# Altium PCB VA_HUB_PCB.PcbDoc (part 7 of 12)
Units mil, origin at the board's own origin, x right, y up, seen from the top; angles counter-clockwise.
Board outline 4408 x 3619 mil, 8 copper layers (Top Layer, Routing 1, Routing 2, Power Plane, GND Plane, Routing 3, Routing 4, Bottom Layer), stack 85.156 mil thick; 569 components, 440 nets, 2911 pads, 1518 vias.
Unrouted connection lines stored in the file: 46.
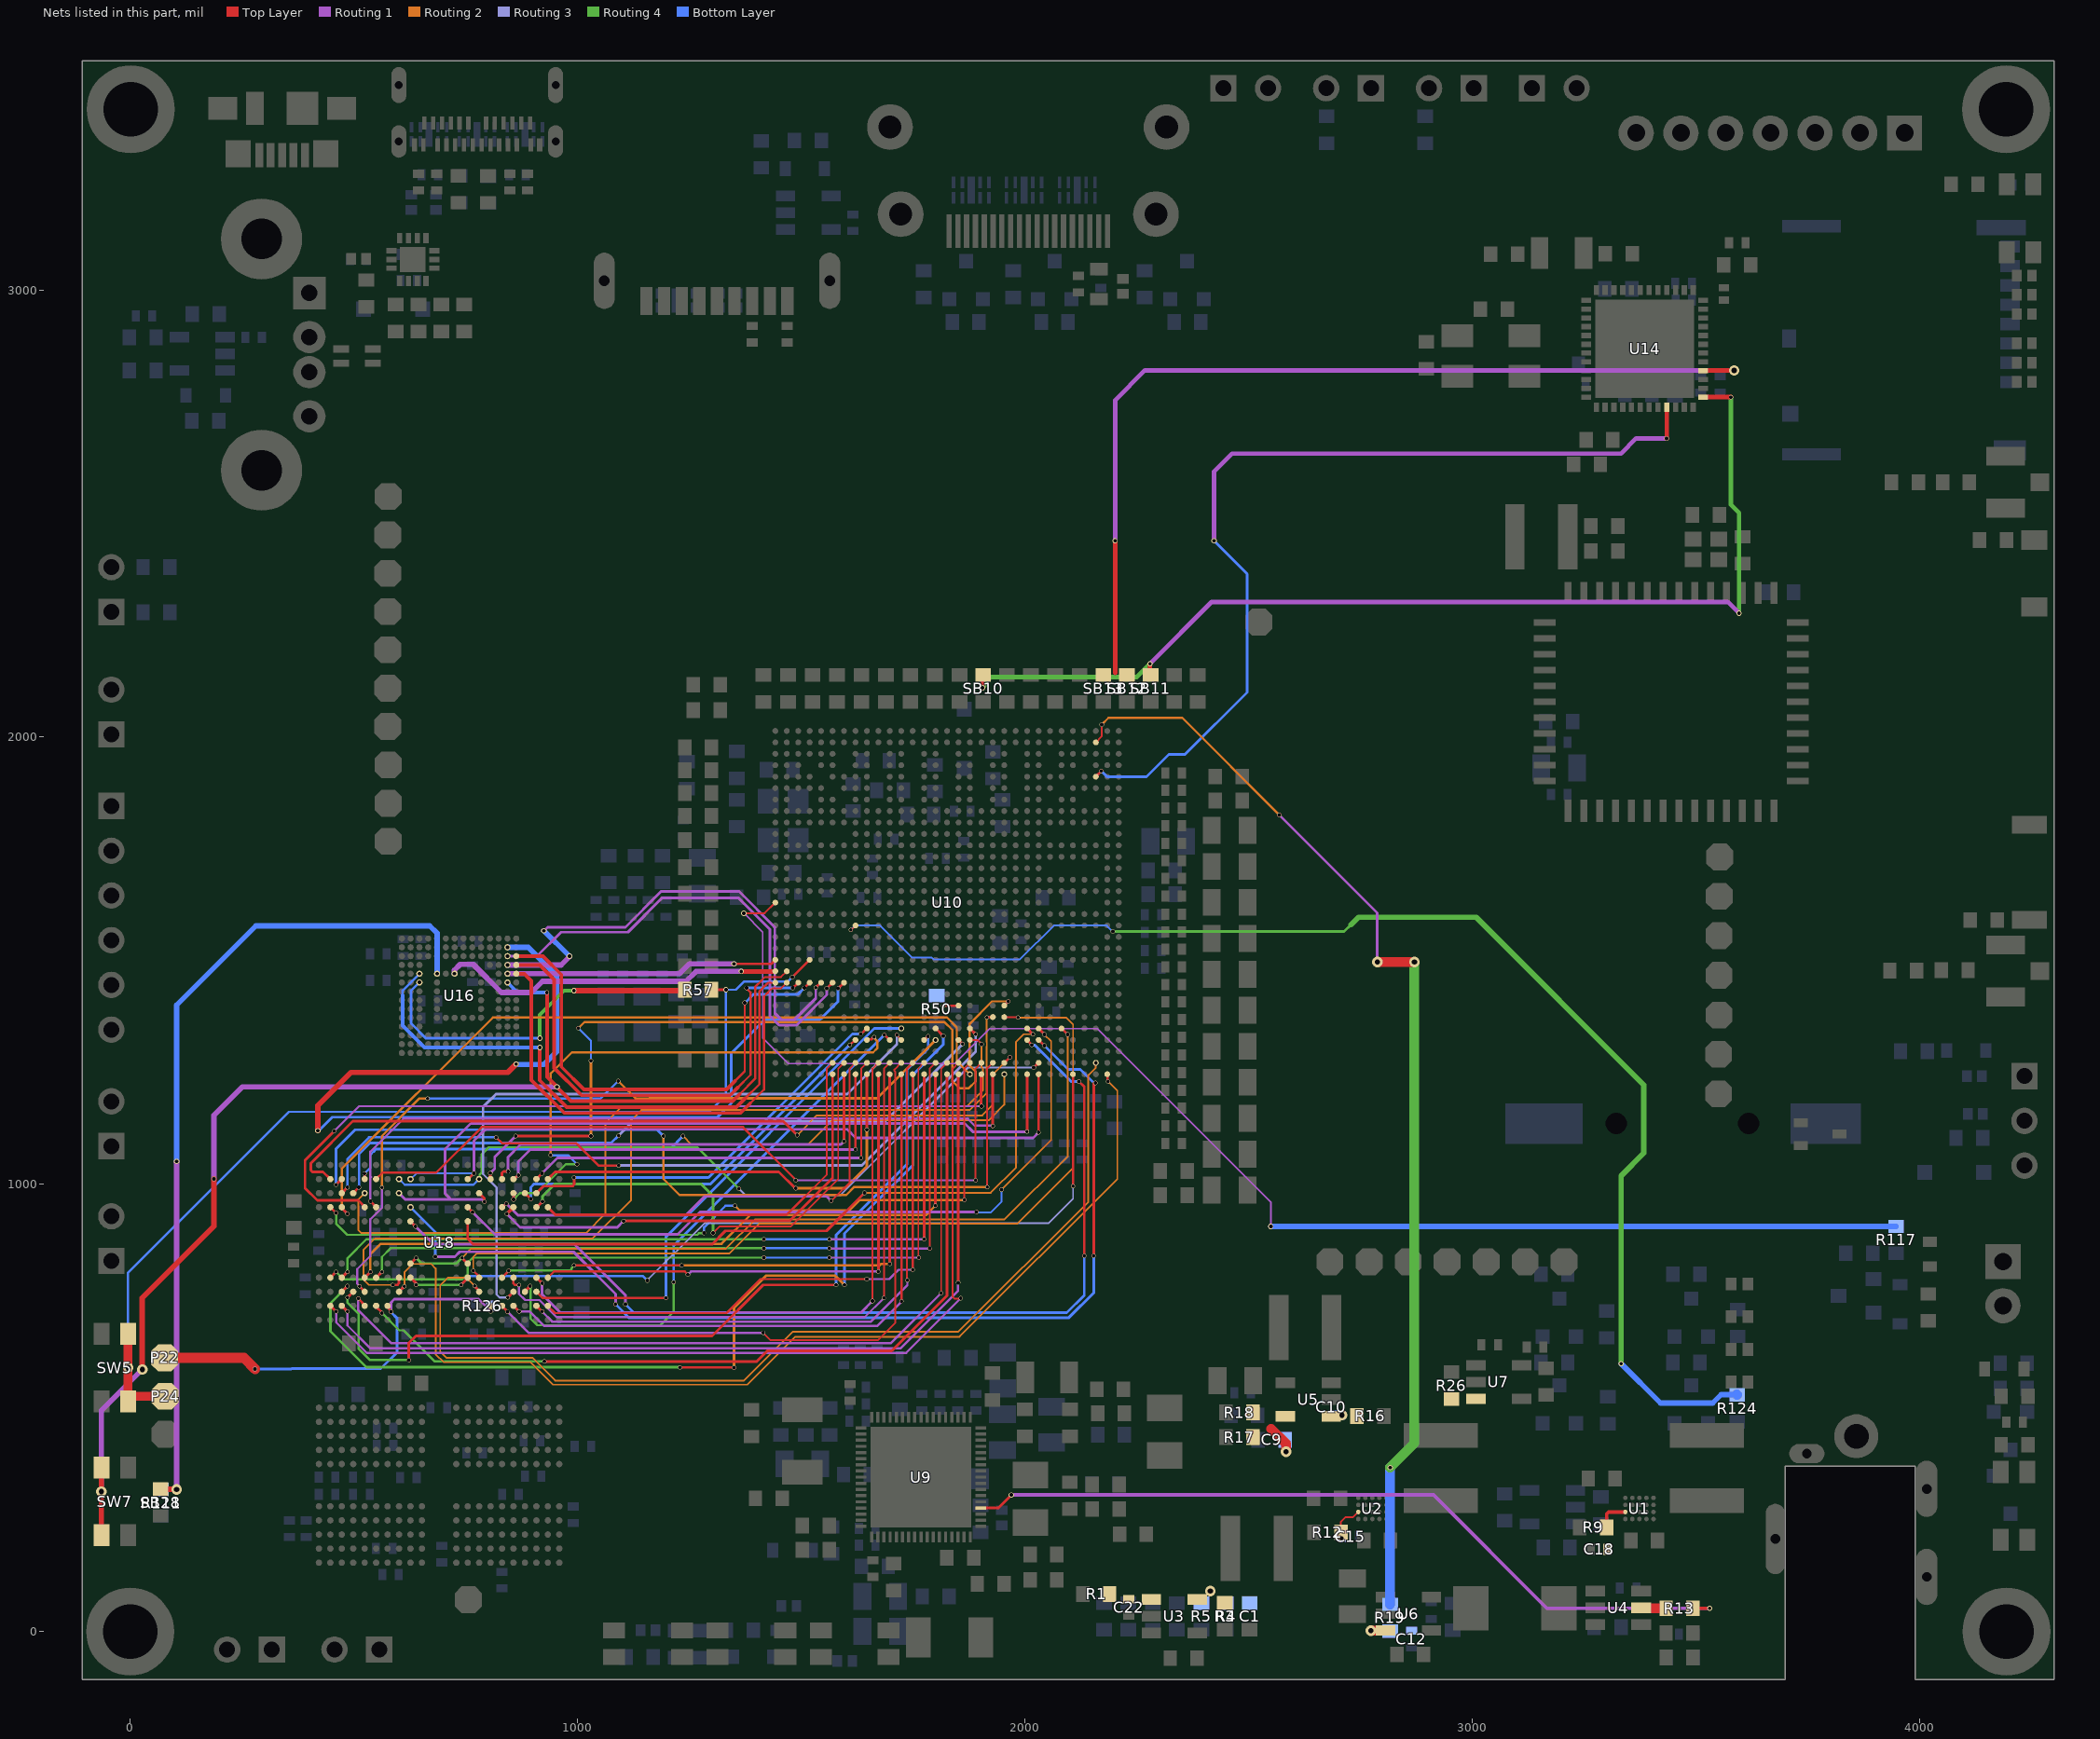
[diagram p10: the nets of this part, all layers, seen from the top]

## Via types
v1: diameter 9.84, hole 7.87, Top Layer to Bottom Layer, 821 vias
v2: diameter 11.81, hole 7.87, Top Layer to Bottom Layer, 575 vias
v3: diameter 23.62, hole 11.81, Top Layer to Bottom Layer, 122 vias

## Nets (pads, with @x,y where several pads share a name; then routed paths per layer and width w, separated by ;. In a path a pad name is that pad's centre, name@x,y a point inside that pad or via, vN(x,y) a via of type N, cw(c..) or ccw(c..) an arc to the next point about the centre after c; other vN are vias at no path point) (continued)
DDR1.DDR1_A3: U10.A9 U18.H10 U18.R10 | length 1801.7
  Top Layer w6: U18.R10@780.18,980.24 791.86,968.55 791.86,961.14 v1(792,961) ; v1@2005.32,1118 U10.A9@2005.32,1246.06
  Routing 1 w6: v1(601.05,980.24) 614.84,966.44 716,966.44 ; v1(792,961) 786.56,966.44 716,966.44 ; 1884,1117 v1@2006,1117 ; 1884,1118 1866,1136 761,1136 704,1079 704,979.16 716,967.16 716,966.44
  other v1: 2005,1118
DDR1.DDR1_A4: U10.B8 U18.H11 U18.R11 | length 1665.8
  Top Layer w4: v1(2020,1261) v1@2020.13,1261 ; U10.B8@2030.78,1271.65 U10.B8@2030.91,1271.65
  Top Layer w5: v1(601.05,1011.73) U18.H11@601.05,1011.84
  Top Layer w6: v1@2020.13,1261 U10.B8@2030.78,1271.65
  Routing 4 w5: v1(780.18,1011.73) 781.11,1012.66 781.11,1021.76 786,1026.65 786,1067 802,1083 1268,1083 v1(1361,990)
  Routing 3 w5: v1(1361,990) 1375,976 1588,976 1873,1261 v1(2020,1261)
  Bottom Layer w5: v1(601.05,1011.73) 613.84,998.94 767.39,998.94 v1(780.18,1011.73)
DDR1.DDR1_A5: U10.A8 U18.J11 U18.P11 | length 1653.8
  Top Layer w6: U18.P11@754.59,1013.02 757.05,1013.02 v1@767.74,1023.71 ; U10.A8@2030.91,1246.06 U10.A8@2030.91,1246.06 2030.95,1116.05 v1(2031,1116)
  Routing 1 w6: v1(768.74,1024.53) 768.74,1097.74 793.92,1122.92 1603.08,1122.92 1622,1104 2019,1104 v1(2031,1116)
  Bottom Layer w4: v1(626.64,1011.73) 639.43,1024.53 v1(768.74,1024.53)
DDR1_CKE0: U10.A5 U18.J4 U18.P4 | length 1874
  Top Layer w5: U10.A5@2107.68,1246.06 2107.84,1245.9 2107.84,996.16 v1(2108,996)
  Top Layer w6: U18.J4@626.64,791.26 v1@638.82,779.07 ; v1(740,775) 740,775.83 754.59,790.43 U18.P4@754.59,791.26
  Routing 4 w6: v1(639.56,775.16) 639.64,775.08 739.92,775.08 v1(740,775)
  Routing 3 w4: v1(1156,785) 1284,913 2053,913 2108,968 v1(2108,996)
  Bottom Layer w5: v1(740,775) 759.5,794.5 1146.5,794.5 v1(1156,785)
DDR1_CKE1: U10.E6 U18.J5 U18.P5 | length 1888.3
  Top Layer w5: U10.E6@2082.44,1348.32 2095.76,1335 v1(2096,1335)
  Top Layer w6: U18.J5@626.64,822.76 626.78,822.76 639.43,835.41 v1(639.57,835.41) ; v1(741.79,835.55) U18.P5@754.59,822.76
  Routing 4 w6: v1(639.57,835.41) 651.99,823 729.24,823 v1(741.79,835.55)
  Routing 2 w4: v1(741.79,835.55) 762.24,856 1332,856 1397,921 1954,921 2096,1063 v1(2096,1335)
DDR1_CLK0N: U10.D8 U18.J9 | length 2340.1
  Top Layer w6: U10.D8@2030.91,1322.83 v1(2043.7,1310.03) ; v1(2154,840) v1@2154,1226.82
  Routing 1 w6: v1(682,838) 725.97,838 736.97,849 991,849 1085,755 v1(1085,731.58)
  Bottom Layer w6: v1(626.64,948.74) 682,893.38 v1(682,838) ; v1(1085,731.58) 1114.66,701.92 2098.48,701.92 2154,757.44 v1(2154,840) ; v1(2043.7,1310.03) 2096.74,1257 2123.82,1257 v1@2154,1226.82
  other v1: 2158,1226.82
DDR1_CLK0P: U10.D9 U18.J8 | length 2255
  Top Layer w6: U18.J8@626.64,917.24 626.7,917.24 637.94,906 v1(638,906) ; U10.D9@2005.32,1322.83 2005.32,1322.33 v1@2014.82,1312.82 ; v1(2121,1230) 2132.82,1218.18 v1(2132.82,840)
  Routing 1 w6: v1(638,906) 678,866 993,866 1107,752 v1(1107,731.58)
  Bottom Layer w6: v1(1107,731.58) 1125.66,712.92 2093.92,712.92 2132.82,751.82 v1(2132.82,840) ; v1(2015.82,1311.82) 2016.56,1311.09 2022.56,1311.09 2103.64,1230 v1(2121,1230)
DDR1_CLK1N: U10.E8 U18.P9 | length 1694.1
  Top Layer w6: U18.P9@754.59,948.74 v1(765.57,937.76) ; U10.E8@2030.91,1348.42 v1@2043.7,1335.62
  Routing 1 w6: v1(765.57,937.76) 815.33,888 1224,888 1274,938 v1(1892,938)
  Routing 2 w4: v1(1948,988) 2059,1099 2059,1319.7 v1(2043.7,1335)
  Bottom Layer w4: v1(1892,938) 1893.12,936.88 1923.88,936.88 1948,961 v1(1948,988)
DDR1_CLK1P: U10.E9 U18.P8 | length 1686.1
  Top Layer w5: U10.E9@2005.66,1346.65 2005.66,1348.07 U10.E9@2005.66,1348.42
  Top Layer w6: U18.P8@754.59,917.24 754.59,878.41 766.5,866.5 1301.5,866.5 1330.82,895.82 1556.82,895.82 v1(1641.82,980.82) ; U10.E9@2005.32,1348.42 2005.66,1348.07 v1(2018.11,1335.62)
  Routing 2 w4: v1(1641.82,980.82) 1923.82,980.82 1980.62,1037.62 1980.62,1318.62 1997.62,1335.62 v1(2018.11,1335.62)
DDR1_CS0N: U10.F12 U18.H4 | length 1990.5
  Top Layer w6: v1(587,775) 597.53,775 601.05,778.51 U18.H4@601.05,791.26 ; v1(1915,1373) 1915.51,1373.51 1928.04,1373.51 U10.F12@1928.55,1374.01
  Routing 2 w4: v1(587,775) 534,775 522,787 522,854 547,879 1034,879 1120,965 1120,1143 1143,1166 1877,1166 1915,1204 1915,1307.93 1915.13,1308.06 1915.13,1317.94 1915,1318.07 v1(1915,1373)
DDR1_CS1N: U10.A2 U18.H3 | length 2308
  Top Layer w5: U10.A2@2184.45,1245.71 2185.23,1244.94 2185.23,1230.77 v1(2186,1230)
  Top Layer w6: U18.H3@601.05,759.76 601.05,759.91 613,771.86 v1(613,772)
  Routing 2 w4: v1(613,772) 613,803 632,822 673,822 683,812 683,620 701,602 895,602 945,552 1380,552 1487,659 1854,659 2207,1012 2207,1209 v1(2186,1230)
DDR1_CS2N: U10.F11 U18.R4 | length 1956.5
  Top Layer w5: v1(767.07,806.92) 776.14,797.85 776.14,797.78 780.18,793.74 U18.R4@780.18,791.26 ; U10.F11@1954.14,1374.01 1954.64,1373.51 1984.49,1373.51 v1(1985,1373)
  Routing 2 w4: v1(767.07,806.92) 767.07,838.07 774,845 1339,845 1406,912 1983,912 2108,1037 2108,1357 2092,1373 v1(1985,1373)
DDR1_CS3N: U10.B3 U18.R3 | length 2216.1
  Top Layer w5: U10.B3@2158.86,1271.3 v1(2158.86,1271.65)
  Top Layer w6: v1(770,773) 770,771.96 780.18,761.78 U18.R3@780.18,760.2
  Routing 2 w4: v1(770,773) 752,791 710,791 693,774 693,626 707,612 899,612 950,561 1372,561 1481,670 1851,670 2142,961 2142,1244 2158.86,1260.86 v1(2158.86,1271.65)
DDR1_D0: U10.B15 U18.B2 | length 2066.7
  Top Layer w4: U10.B15@1851.77,1271.65 1838.73,1258.6 1838.73,748 1842.42,744.31 v1@1857,744.31
  Top Layer w6: U18.B2@447.5,728.27 U18.B2@447.5,728.27 460.36,715.47 v1(460.43,715.47)
  Routing 1 w5: v1(460.43,715.47) 460.3,715.35 460.3,691.7 529,623 1734.69,623 v1(1857,745.31)
DDR1_D1: U10.A15 U18.C2 | length 1973.7
  Top Layer w6: U18.C2@473.09,728.27 v1(485.89,715.47) ; v1(1851,780) 1851.39,780.39 1851.39,1245.67 U10.A15@1851.77,1246.06
  Routing 1 w5: v1@485.76,715.35 485.76,684.24 537,633 1722,633 1851,762 v1(1851,780)
  Routing 1 w6: v1@485.76,715.35 v1(485.89,715.47)
DDR1_D2: U10.B16 U18.E2 | length 1948.5
  Top Layer w4: v1(1813,757) 1813.09,757.09 1813.09,1258.55 U10.B16@1826.18,1271.65
  Top Layer w6: v1(510,745) U18.E2@524.28,728.27
  Routing 1 w5: v1(510,745) 510,718.36 583.36,645 1701,645 v1(1813,757)
DDR1_D3: U10.A16 U18.F2 | length 1885.5
  Top Layer w6: U18.F2@549.87,728.27 549.87,726.17 563,713.04 v1(563,712) ; v1(926,604) 1401,604 1425,628 1703,628 1826.18,751.18 U10.A16@1826.18,1246.06
  Routing 4 w5: v1(563,712) 601.46,673.54 611.46,673.54 681,604 v1(926,604)
DDR1_D4: U10.B17 U18.F4 | length 1705.3
  Top Layer w4: v1(1787.55,856.55) 1787.55,1258.6 U10.B17@1800.59,1271.65
  Top Layer w6: U18.F4@549.87,791.26 v1(562.66,804.06)
  Routing 1 w5: v1(1563,857) 1563.45,856.55 v1(1787.55,856.55)
  Routing 4 w5: v1(562.66,804.06) 562.66,837.66 582,857 v1(1416.82,857)
  Bottom Layer w5: v1(1416.82,857) v1(1563,857)
DDR1_D5: U10.A17 U18.E4 | length 1660.1
  Top Layer w6: U18.E4@524.28,791.26 v1(537.07,804.06) ; v1(1800,952) 1800,1245.46 U10.A17@1800.59,1246.06
  Routing 2 w5: v1(537.07,804.06) 537.07,844.07 560,867 1322,867 1386,931 1779,931 v1(1800,952)
DDR1_D6: U10.A18 U18.C4 | length 1724.5
  Top Layer w6: U18.C4@473.09,791.26 v1(485.89,804.06) ; v1(1775,877) U10.A18@1775,1246.06
  Routing 1 w5: v1(1563,877) v1(1775,877)
  Routing 4 w5: v1(485.89,804.06) 485.89,834.75 528.14,877 v1(1416.82,877)
  Bottom Layer w5: v1(1416.82,877) v1(1563,877)
DDR1_D7: U10.B18 U18.B4 | length 1803.4
  Top Layer w4: v1@1761.96,836 1761.96,1258.6 U10.B18@1775,1271.65
  Top Layer w6: U18.B4@447.5,791.26 v1(460.3,804.06)
  Routing 1 w5: v1(1563,836) v1(1762.96,836)
  Routing 4 w5: v1(460.3,804.06) 476.78,787.58 742.58,787.58 754.65,799.65 754.65,824.65 766,836 v1(1416.82,836)
  Bottom Layer w5: v1(1416.82,836) v1(1563,836)
DDR1_D8: U10.B11 U18.B11 | length 1811.5
  Top Layer w4: U10.B11@1954.14,1271.65 U10.B11@1954.39,1271.65
  Top Layer w6: U18.B11@447.5,1011.73 431.24,1028 407.51,1028 404,1031.51 404,1047 498,1141 1460,1141 v1(1491,1110) ; U10.B11@1954.39,1271.65 v1(1966.75,1284)
  Routing 2 w4: v1(1491,1110) 1535,1154 1905,1154 1928,1177 1928,1245.25 v1(1966.75,1284)
DDR1_D9: U10.B12 U18.C11 | length 1978.9
  Top Layer w4: v1(1916,994) 1916,1259.1 U10.B12@1928.55,1271.65
  Top Layer w6: v1(460.3,998.94) U18.C11@473.09,1011.73
  Routing 2 w5: v1(1192,1108) 1192,1012 1228,976 1601,976 1619,994 v1(1916,994)
  Bottom Layer w6: v1(460.3,998.94) 460.3,1079.3 503,1122 1178,1122 v1(1192,1108)
DDR1_D10: U10.A11 U18.E11 | length 1606.9
  Top Layer w4: v1(524,1024) v1@524.14,1023.86 ; U18.E11@524.14,1011.87 U18.E11@524.28,1011.73
  Top Layer w6: U18.E11@524.14,1011.87 v1@524.14,1023.86
  Routing 2 w4: v1(1236,1108) 1255,1089 1515,1089 1569,1143 1919,1143 1954,1178 v1(1954,1246)
  Bottom Layer w5: v1(524,1024) 537,1037 537,1066 544,1073
  Bottom Layer w6: 544,1073 550,1079 1207,1079 v1(1236,1108)
DDR1_D11: U10.B13 U18.F11 | length 1706.4
  Top Layer w4: v1(1890,1009) 1890,1258.69 U10.B13@1902.96,1271.65
  Top Layer w5: U18.F11@550,1011.87 564.13,1026 684,1026 786,1128 1370,1128 v1@1489,1009
  Routing 1 w5: v1(1488,1009) v1(1890,1009)
DDR1_D12: U10.A12 U18.F9 | length 1676.7
  Top Layer w6: v1(537,962) 537,961.8 549.87,948.94 U18.F9@549.87,948.74 ; v1@1928.55,1128.35 U10.A12@1928.55,1246.06
  Routing 1 w5: v1(537,962) 537,1016.16 ; 539,1016.16 537,1018.16 537,1073 610.69,1146.69 1872.31,1146.69 1887.65,1131.35 v1@1928.65,1131.35
  other v1: 1928.65,1130.35
DDR1_D13: U10.A13 U18.E9 | length 1848
  Top Layer w6: v1(456,1119) 391,1054 391,991.23 418.23,964 510,964 524.28,949.72 U18.E9@524.28,948.74 ; v1@1902,1174.69 1902.48,1175.17 1902.48,1245.58 U10.A13@1902.96,1246.06
  Routing 1 w5: v1(456,1119) 511.69,1174.69 v1(1903,1174.69)
DDR1_D14: U10.A14 U18.C9 | length 1767.6
  Top Layer w6: U18.C9@473.09,948.74 473.09,946.74 v1(485.89,933.94)
  Routing 2 w5: v1(485.89,933.94) 473,946.83 473,1035 811,1373 1826,1373 1848,1351 1848,1275 v1(1877,1246)
DDR1_D15: U10.B14 U18.B9 | length 1817.5
  Top Layer w4: v1@1864.32,965 1864.32,1258.6 U10.B14@1877.37,1271.65
  Top Layer w6: U18.B9@447.5,948.74 v1(460.3,935.94)
  Routing 4 w5: v1(460.3,935.94) 460.3,911.7 485,887 1268.08,887 1272.08,891 v1(1283,891)
  Routing 2 w5: v1(1352,952) 1362,942 1608,942 1631,965 v1(1865,965)
  Bottom Layer w5: v1(1283,891) 1283,904 1331,952 v1(1352,952)
DDR1_D16: U10.A19 U18.AA2 | length 1299.7
  Top Layer w5: U18.AA2@933.72,728.27 949.99,712 1333,712 1409,788 v1(1647,788)
  Top Layer w6: v1(1749.41,809) U10.A19@1749.41,1246.06
  Routing 1 w5: v1(1647,788) 1697,788 1718,809 v1(1749.41,809)
DDR1_D17: U10.B19 U18.Y2 | length 1380.3
  Top Layer w4: v1@1736.37,785.5 1736.37,1258.6 U10.B19@1749.41,1271.65
  Top Layer w6: U18.Y2@908.18,728.27 v1@920.93,715.52
  Routing 1 w5: v1(920.98,715.52) 943.5,693 1656,693 1737.5,774.5 v1(1737.5,785.5)
DDR1_D18: U10.A20 U18.V2 | length 1417.9
  Top Layer w6: U18.V2@856.95,728.27 v1(869.75,715.47) ; U10.A20@1723.82,1246.06 1724.41,1245.47 1724.41,738.59 v1(1724.72,738.28)
  Routing 1 w5: v1(869.75,715.47) 893.53,715.47 926,683 1670,683 1724.72,737.72 v1(1724.72,738.28)
DDR1_D19: U10.B20 U18.U2 | length 1515.7
  Top Layer w4: v1(1415,668) 1431,652 1672,652 1710.73,690.73 1710.73,1251.23 1708.73,1253.24 1708.73,1256.55 U10.B20@1723.82,1271.65
  Top Layer w6: U18.U2@831.36,728.27 831.36,727.67 843.56,715.47 v1(843.56,714.87)
  Routing 1 w5: v1(843.56,714.87) 890.43,668 v1(1415,668)
DDR1_D20: U10.A21 U18.U4 | length 1306.1
  Top Layer w5: U18.U4@831.36,791.26 846,805.9 v1(846,807) ; v1(992.08,819) v1(1233,819)
  Top Layer w6: v1(1698.23,822) U10.A21@1698.23,1246.06
  Routing 4 w5: v1(846,807) 846.08,806.92 982.92,806.92 986.46,810.46 986.46,812.07 992.08,817.69 v1(992.08,819)
  Routing 2 w5: v1(1233,819) 1676,819 1679,822 v1(1698.23,822)
DDR1_D21: U10.B21 U18.V4 | length 1433.7
  Top Layer w4: v1@1685.19,745.5 v1(1685.19,746) 1685.19,1258.6 U10.B21@1698.23,1271.65
  Top Layer w5: U18.V4@856.95,791.26 856.95,777.93 859.88,775 v1(869,775)
  Routing 1 w5: v1(869,775) 869,755 882.87,741.13 914.87,741.13 953,703 1642.19,703 v1(1685.19,746)
DDR1_D22: U10.B22 U18.Y4 | length 1346.9
  Top Layer w4: v1(1659.59,739) 1659.59,1258.6 U10.B22@1672.64,1271.65
  Top Layer w6: U18.Y4@908.13,791.26 908.26,791.26 921.04,778.47 v1(921.17,778.47)
  Routing 1 w6: v1(921.17,778.47) 920.93,778.23 920.93,754.07 961.5,713.5 1634.09,713.5 v1(1659.59,739)
DDR1_D23: U10.A22 U18.AA4 | length 1191.4
  Top Layer w5: U18.AA4@933.72,791.26 947.31,804.85 1240.15,804.85 v1(1247,798)
  Top Layer w6: v1(1672.64,804.85) U10.A22@1672.64,1246.06
  Routing 1 w5: v1(1247,798) 1253.85,804.85 v1(1672.64,804.85)
DDR1_D24: U10.A23 U18.AA11 | length 960.7
  Top Layer w6: U18.AA11@933.72,1011.73 949.99,1028 1450,1028 v1@1487,991 ; v1(1647,1122) U10.A23@1647.05,1246.06
  Routing 2 w6: v1(1488,991) 1598,991 1647,1040 v1(1647,1122)
DDR1_D25: U10.B23 U18.Y11 | length 963.5
  Top Layer w4: v1(1634,1059) 1634,1258.6 U10.B23@1647.05,1271.65
  Top Layer w6: U18.Y11@908.13,1011.73 v1(920.93,1024.53)
  Routing 1 w6: v1(920.93,1024.53) 955.4,1059 v1(1634,1059)
DDR1_D26: U10.A24 U18.V11 | length 978.7
  Top Layer w6: U18.V11@856.95,1011.73 858.13,1011.73 866.98,1020.58 v1(868.02,1020.58) ; v1(1621.46,1077.94) U10.A24@1621.46,1246.06
  Routing 1 w6: v1(868.02,1020.58) 867.28,1021.31 867.28,1050.73 894.5,1077.94 v1(1621.46,1077.94)
DDR1_D27: U10.A25 U18.U11 | length 974
  Top Layer w6: U18.U11@831.36,1010.73 831.36,1025.49 834.88,1029 v1(845,1029) ; v1@1595.87,1098.79 U10.A25@1595.87,1246.06
  Routing 1 w6: v1@845,1030 844.58,1030.42 844.58,1060.58 872.94,1088.94 1588.94,1088.94 v1(1596,1096)
DDR1_D28: U10.B24 U18.U9 | length 1102.1
  Top Layer w4: v1(1567,963) 1608.41,1004.41 1608.41,1258.6 U10.B24@1621.46,1271.65
  Top Layer w6: U18.U9@831.96,948.65 840.31,957 v1(841,957)
  Routing 1 w6: v1(841,957) 867,931 1242,931 1284,973 1557,973 v1(1567,963)
DDR1_D29: U10.A26 U18.V9 | length 1039.3
  Top Layer w6: v1@1103,917.96 1474.12,917.96 1570.28,1014.12 U10.A26@1570.28,1246.06
  Top Layer w8: v1(842,934) 842.11,934 856.85,948.74 U18.V9@856.95,948.74
  Routing 1 w6: v1(842,934) 872,904 1089,904 v1(1103,918)
DDR1_D30: U10.B25 U18.Y9 | length 1112.6
  Top Layer w4: v1(1303,891) 1318,906 1477.16,906 1582.82,1011.67 1582.82,1258.6 U10.B25@1595.87,1271.65
  Top Layer w6: U18.Y9@908.13,948.74 908.63,948.74 921.43,961.54 v1(921.92,961.54)
  Routing 4 w6: v1(921.92,961.54) 921.92,972.92 950,1001 1276,1001 1303,974 v1(1303,891)
DDR1_D31: U10.B26 U18.AA9 | length 923.2
  Top Layer w4: 1508.52,972.52 1557.23,1021.23 1557.23,1258.6 U10.B26@1570.28,1271.65
  Top Layer w6: U18.AA9@933.72,948.74 950.46,932 1468,932 1508.52,972.52
DDR1_DM0: U10.E17 U18.C3 | length 2164.2
  Top Layer w6: U18.C3@473.09,759.76 v1(485.89,772.56) ; v1(1229,590.5) 1349.5,590.5 v1(1350,590) ; U10.E17@1800.59,1348.42 1800.96,1348.42 1817.38,1332 v1(1817.75,1332)
  Routing 4 w6: v1(485.89,772.56) 447.5,734.17 447.5,671.5 528,591 1228.5,591 v1(1229,590.5)
  Routing 2 w6: v1(1350,590) 1350,724 1422,796 1576,796 v1(1597,775)
  Bottom Layer w6: v1@1597,774 v1(1597,775) 1597,890 1749.41,1042.41 1749.41,1244.18 1817.75,1312.52 v1(1817.75,1332)
DDR1_DM1: U10.E14 U18.C10 | length 1695.3
  Top Layer w5: v1(818,1105) 831,1092 997,1092 1047,1042 v1(1092,1042)
  Top Layer w6: U18.C10@473.09,980.24 v1(485.89,993.03) ; U10.E14@1877.37,1348.42 1877.43,1348.42 1890.23,1335.62 v1(1890.29,1335.62)
  Routing 3 w6: v1(1092,1042) 1636,1042 1890.29,1296.29 v1(1890.29,1335.62)
  Bottom Layer w5: v1(485.89,993.03) 485.89,1056.89 534,1105 v1(818,1105)
DDR1_DM2: U10.E20 U18.Y3 | length 1151.5
  Top Layer w5: U18.Y3@908.13,759.76 921.9,746 v1(1197.98,746)
  Top Layer w6: v1(1723.82,1348.42) U10.E20@1724.24,1348
  Bottom Layer w6: v1(1197.98,746) 1197.98,882.53 1663.87,1348.42 v1(1723.82,1348.42)
DDR1_DM3: U10.E23 U18.Y10 | length 901.1
  Top Layer w6: U18.Y10@908.13,980.24 923.9,996 989,996 992.51,999.51 992.51,1014.56 v1(992.08,1015) ; v1(1633.53,1336.35) 1634.25,1336.35 1646.33,1348.42 U10.E23@1647.05,1348.42
  Bottom Layer w6: v1(992.08,1015) 1293,1015 1614.35,1336.35 v1(1633.53,1336.35)
DDR1_DQS0M: U10.D17 U18.E3 | length 1737.1
  Top Layer w6: v1(513,772) 513,771.52 524.28,760.24 U18.E3@524.28,759.76
  Routing 1 w5: v1(513,772) 507.42,777.58 507.42,810.42 536.7,839.7 536.7,921.7 562.66,947.66 v1(562.66,993)
  Routing 2 w5: v1(562.66,993) 562.66,1107.66 647,1192 v1(665,1192) ; v1(1091,1231) 1130,1192 1160.5,1192
  Routing 2 w6: 1160.5,1192 1669.76,1192 v1(1800.59,1322.83)
  Bottom Layer w5: v1(665,1192) 1052,1192 v1(1091,1231)
DDR1_DQS0P: U10.D18 U18.D3 | length 1967.4
  Top Layer w6: v1(485.89,746.97) U18.D3@498.69,759.76 ; v1(623,607) 623,645 639,661 1301,661 1415,775 v1(1578,775) ; U10.D18@1775,1322.83 1775.42,1322.83 1783.59,1331 v1(1784,1331)
  Routing 4 w5: v1(485.89,746.97) 485.89,735.09 511,709.98 511,632 536,607 v1(623,607)
  Bottom Layer w6: v1@1578,774 v1(1578,775) 1578,886.56 1736.37,1044.92 1736.37,1256.37 1784,1304 v1(1784,1331)
DDR1_DQS1M: U10.D14 U18.E10 | length 1872.8
  Top Layer w4: U10.D14@1877.37,1322.83 1894.77,1322.83 1903.21,1314.39 v1(1903.21,1313)
  Routing 2 w4: v1(524.28,980.24) 510,965.96 510,898 517,891 1019,891 1062,934 1062,1136.66 1100.34,1175 1871,1175 1906,1210 1906,1259.31 1903.21,1262.1 v1(1903.21,1313)
DDR1_DQS1P: U10.D15 U18.D10 | length 1556.8
  Top Layer w6: U18.D10@498.69,980.24 v1(511.48,993.03) ; U10.D15@1851.77,1322.83 v1(1860.87,1313.82)
  Routing 3 w6: v1(1092,1109) 1123,1140 1687.05,1140 v1(1860.87,1313.82)
  Bottom Layer w5: v1(511.48,993.03) 511.48,1067.48
  Bottom Layer w6: 511.48,1067.48 536,1092 1075,1092 v1(1092,1109)
DDR1_DQS2M: U10.D20 U18.V3 | length 1496.8
  Top Layer w4: v1(1714,1334) 1714,1333.33 1723.82,1323.5 U10.D20@1723.82,1322.83
  Top Layer w6: v1(844.16,746.97) U18.V3@856.95,759.76
  Routing 3 w5: 789,1072 789,1023 818.94,993.06 818.94,754.06 826.03,746.97 v1(844.16,746.97)
  Routing 3 w6: 789,1072 789,1173 818,1202 1602.99,1202 1714,1313.01 v1(1714,1334)
DDR1_DQS2P: U10.D21 U18.W3 | length 1260.1
  Top Layer w6: U18.W3@882.54,759.76 882.54,760.35 894.17,771.97 v1(894.17,772.56) ; v1(1686,1334) 1686.53,1334 1697.7,1322.83 U10.D21@1698.23,1322.83
  Routing 4 w5: v1(894.17,772.56) 894.96,771.76 894.96,700.04 910,685 1185,685 1215,715 v1(1215,781.33)
  Bottom Layer w6: v1(1215,781.33) 1215,863 v1(1686,1334)
DDR1_DQS3M: U10.D23 U18.V10 | length 1238.8
  Top Layer w6: v1(857,966) U18.V10@856.98,980.21 ; U10.D23@1647,1323 1648.17,1324.17 1656.85,1324.17 1661.82,1329.14 v1(1662.86,1329.14)
  Routing 4 w5: v1(857,966) 871.24,980.24 909.24,980.24 974,1045 v1(999,1045)
  Routing 2 w5: v1(940,1065) 940,1247.67 987.33,1295 1661,1295 1670,1304 1670,1320.69 1662.86,1327.83 v1(1662.86,1329.14)
  Bottom Layer w5: v1(940,1065) 979,1065 v1(999,1045)
DDR1_DQS3P: U10.D24 U18.W10 | length 907.4
  Top Layer w6: U18.W10@882.54,980.24 882.65,980.24 v1(895.89,967) ; v1(1608.99,1311.81) 1609.71,1311.81 1620.74,1322.83 U10.D24@1621.46,1322.83
  Bottom Layer w6: v1(895.89,967) 895.89,993.58 903.31,1001 1298.18,1001 v1(1608.99,1311.81)
DDR1_ODT0: P22.1 R126.2 U18.G2 U18.T2 | length 929.5
  Top Layer w6: U18.G2@577.02,726.7 U18.G2@575.46,728.27 v1(583,715) ; U18.T2@805.77,728.27 805.89,728.15 v1(805.89,716.11)
  Top Layer w22: P22.1@77,612 254,612 v1(279,587)
  Routing 1 w6: v1(583,715) 583,735.49 590.51,743 779,743 v1(805.89,716.11)
  Bottom Layer w6: v1(279,587) 360.03,587 361.03,588 560.5,588 597,624.5 597,699.96 583,713.96 v1(583,715)
DDR1_PZQ: R50.1 U10.G15 | length 34
  Top Layer w5: v1(1818,1399) 1818.3,1399.3 1851.47,1399.3 U10.G15@1851.77,1399.6
DDR1_RST: U10.G11 U18.T11 | length 1823.8
  Top Layer w6: v1(805,1025) 805.39,1024.61 805.39,1012.12 U18.T11@805.77,1011.73 ; v1(862,1108) v1(1030,1108) ; U10.G11@1954.32,1399.77 v1@1963.32,1408.78
  Routing 1 w6: v1(805,1025) 815,1035 815,1061 v1(862,1108)
  Routing 2 w5: v1(1002,1349) 1016,1363 1820.14,1363 1838,1345.14 1838,1230.73 1853.73,1215 1875,1215 1890.29,1230.29 1890.29,1251.71 1877,1265 1877,1359.34 1926.77,1409.12 v1(1963.32,1409.12)
  Routing 2 w6: v1(1030,1108) v1(1030,1276)
  Bottom Layer w5: v1(1002,1349) 1030,1321 v1(1030,1276)
DIY_LED: R124.2 U10.P24 | length 2978.4
  Top Layer w4: v1@1610,1569 v1(1611,1569) 1611.72,1569 U10.P24@1621.46,1578.74
  Routing 4 w6: v1(2197,1565.1) 2714.1,1565.1 2729.5,1580.5
  Routing 4 w12: 2729.5,1580.5 2746,1597 3009,1597 3384,1222 3384,1070 3333,1019 v2(3333,599)
  Bottom Layer w4: v1(1611,1569) 1621,1579 1676,1579 1748.31,1506.69 1792.19,1506.69 1796.04,1502.84 1988.84,1502.84 2064.74,1578.74 2183.36,1578.74 v1(2197,1565.1)
  Bottom Layer w12: v2(3333,599) 3421,511 3538,511 3556.74,529.74 R124.2@3591.91,529.74
  Bottom Layer w22: R124.2@3591.91,529.74 R124.2@3592.82,528.82
DSP_I2S.I2S2_CK: U10.AG3 U14.21 | length 2064.3
  Top Layer w6: U10.AG3@2158.86,1911.41 2158.86,1911.89 2170.83,1923.85 v1(2170.83,1924.33)
  Top Layer w10: v1(3434.82,2667.82) 3435.13,2668.13 3435.13,2694.51 U14.21@3435.13,2737.44
  Routing 1 w10: v2(2423,2438.82) 2423,2593.5 2463.32,2633.82 3332.91,2633.82 3366.91,2667.82 v1(3434.82,2667.82)
  Bottom Layer w6: v1(2170.83,1924.33) 2184.16,1911 2272,1911 2322,1961 2357.91,1961 2497,2100.09 2497,2364.82 v2(2423,2438.82)
DSP_I2S.I2S2_SD: SB12.1 SB13.1 U14.28 | length 2116.6
  Top Layer w10: SB13.1@2175.69,2138.82 SB13.1@2185.69,2148.82 ; 2202,2143.5 v2@2202,2436.82 ; SB12.1@2218.47,2148.82 SB12.1@2228.47,2138.82 ; U14.28@3516.82,2819.14 3517.16,2819.48 3585.48,2819.48 v3(3585.82,2819.82)
  Routing 1 w10: v2(2202,2438.82) 2202,2753 2268.82,2819.82 v3(3585.82,2819.82)
DSP_I2S.I2S2_WS: SB10.1 SB11.1 U14.25 | length 2392.2
  Top Layer w10: v2(1906,2110.09) 1906,2138.13 SB10.1@1906.69,2138.82 ; v2(2280,2163.91) 2280,2140.08 SB11.1@2281.26,2138.82 ; U14.25@3516.82,2760.08 v1@3578.82,2760.08
  Routing 1 w10: v2(2280,2163.91) 2280,2164.07 2417.93,2302 3572,2302 v2(3597,2277)
  Routing 4 w10: v2(1906,2110.09) 1906,2110.58 1914.29,2118.88 1914.29,2125.29 1923,2134 2250.09,2134 v2(2280,2163.91) ; v1@3578.82,2760.08 v1(3578.82,2759.9) 3578.82,2519.6 3597,2501.43 v2(3597,2277)
EFUSE_VQPS_EN_H: R19.2 U10.AK3 | length 2499.7
  Top Layer w4: U10.AK3@2158.86,1988.18 2171.96,2001.28 2171.96,2027.96 v1(2172,2028)
  Top Layer w22: v3(2788,1497) v3(2871,1497)
  Routing 1 w6: v1(2569,1826) 2788,1607 v3(2788,1497)
  Routing 4 w22: v2(2816.82,366.82) 2871,421 v3(2871,1497)
  Routing 2 w5: v1(2172,2028) 2187,2043 2352,2043 v1(2569,1826)
  Bottom Layer w22: R19.2@2816.82,60.82 v2(2816.82,366.82)
EMMC.EMMC_CLK: R57.1 U16.M6 | length 801.5
  Top Layer w6: U16.M6@646.66,1451.14 646.66,1451.66 v1(646.82,1451.82)
  Top Layer w12: v2(992.05,1433.05) 1238.05,1433.05 R57.1@1239.82,1434.82
  Routing 4 w8: v2(915.82,1326.82) 915.82,1378.82 970.05,1433.05 v2(992.05,1433.05)
  Bottom Layer w6: v1(646.82,1451.82) 627.82,1432.82 627.82,1359.82 660.82,1326.82 v2(915.82,1326.82)
EMMC.EMMC_CMD: U10.J31 U16.M5 | length 1321
  Top Layer w5: 1375,1192 1407,1224 1407,1432 1425.78,1450.78 U10.J31@1442.33,1450.78
  Top Layer w6: U16.M5@646.66,1470.82 v1(646.82,1470.82)
  Top Layer w8: v2(915.82,1305.82) 915.82,1232.56 975.88,1172.5 1355.5,1172.5 1375,1192
  Bottom Layer w5: 608.82,1422.82 608.82,1432.82 v1(646.82,1470.82)
  Bottom Layer w8: 608.82,1422.82 608.82,1354.82 657.82,1305.82 v2(915.82,1305.82)
EMMC.EMMC_D0: U10.J28 U16.A3 | length 1089.2
  Top Layer w5: 1352,1231 1374,1253 v1(1374,1406)
  Top Layer w6: v1@1506.05,1437.99 1506.3,1437.99 U10.J28@1519.1,1450.78
  Top Layer w8: U16.A3@863.19,1510.19 922.45,1510.19 963.82,1468.82 963.82,1262.56 1014.38,1212 1333,1212 1352,1231
  Bottom Layer w6: v1@1375,1406 1394,1425 1493.06,1425 v1(1507.05,1438.99)
EMMC.EMMC_D1: U10.J29 U16.A4 | length 1097.8
  Top Layer w5: 1358,1216 1387,1245 1387,1429.06 v1@1378.08,1437.99
  Top Layer w6: v1@1480.21,1437.99 1480.71,1437.99 U10.J29@1493.51,1450.78
  Top Layer w8: U16.A4@863.19,1490.51 915.14,1490.51 947.82,1457.82 947.82,1260.18 1009,1199 1341,1199 1358,1216
  Bottom Layer w6: v1(1378.08,1438.99) v1(1481.21,1438.99)
EMMC.EMMC_D2: U10.J30 U16.A5 | length 1106
  Top Layer w4: 1425.99,1428.99 1434.99,1437.99 1455.12,1437.99 U10.J30@1467.92,1450.78
  Top Layer w5: 1386,1181 1417,1212 1417,1420 1425.99,1428.99
  Top Layer w8: U16.A5@863.19,1470.82 880.82,1470.82 896.82,1454.82 896.82,1233.18 970.5,1159.5 1364.5,1159.5 1386,1181
EMMC.EMMC_D3: U10.J25 U16.B2 | length 2340.1
  Top Layer w6: v1(1582.57,1437.99) 1582.82,1437.99 1595.62,1450.78 U10.J25@1595.87,1450.78
  Top Layer w12: v2(419.68,1120) 419.68,1176.18 493.5,1250 844.09,1250 v2(863,1268.91)
  Bottom Layer w6: v2@421.68,1120 451.68,1150 1313,1150 1344,1181 1344,1293 1418.82,1367.82 1541.82,1367.82 1582.57,1408.57 v1(1582.57,1437.99)
  Bottom Layer w12: v1(843.51,1529.88) 889.77,1529.88 952.82,1466.82 952.82,1295.82 925,1268 863.91,1268 v2(863,1268.91)
EMMC.EMMC_D4: U10.J26 U16.B3 | length 1059.8
  Top Layer w6: v1(1557.48,1437.99) U10.J26@1570.28,1450.78
  Routing 1 w6: v1(843.51,1510.19) 909.45,1510.19 963.08,1563.82 1112.82,1563.82 1189.72,1640.72 1359.28,1640.72 1430,1570 1430,1376.64 1450.67,1355.98 1489.98,1355.98 1557.48,1423.48 v1(1557.48,1437.99)
EMMC.EMMC_D5: U10.J27 U16.B4 | length 1162.7
  Top Layer w6: v1(1532.89,1439.99) 1543.69,1450.78 U10.J27@1544.69,1450.78
  Routing 1 w6: v2(925,1567) 933,1575 1107,1575 1186.82,1654.82 1361.18,1654.82 1441,1575 1441,1382.64 1455.64,1368 1485,1368 1532.89,1415.89 v1(1532.89,1439.99)
  Routing 1 w12: v1(843.51,1490.51) 963.51,1490.51 v2@982,1509
  Bottom Layer w12: v2(925,1567) v2(982,1510)
EMMC.EMMC_D6: U10.L31 U16.B5 | length 611.7
  Top Layer w6: v2(1350,1493) 1433.36,1493 U10.L31@1442.33,1501.96
  Routing 1 w12: v1(843.51,1470.82) 1227.82,1470.82 1250,1493 v2(1350,1493)
EMMC.EMMC_D7: SW7.2 U10.K30 U16.B6 | length 2966.9
  Top Layer w4: 1411,1455 1419.58,1463.58 1455.12,1463.58 U10.K30@1467.92,1476.37
  Top Layer w5: 1363,1202 1397,1236 1397,1441 1411,1455
  Top Layer w8: v1(931.82,1428.82) 931.82,1240.18 v2(954,1218) 954,1216.97 984.97,1186 1347,1186 1363,1202
  Top Layer w12: SW7.2@-64.18,219.72 v3(-64.18,313) SW7.2@-64.18,362.35 ; v3(27,586) 27,746 187.14,906.14 v1(187.14,1011.86)
  Routing 1 w12: v3(-64.18,313) -64.18,494.82 v3(27,586) ; v1(187.14,1011.86) 187.14,1154.14 251,1218 v2(954,1218)
  Bottom Layer w8: v1(843.51,1451.14) 865.82,1428.82 v1(931.82,1428.82)
EMMC.EMMC_STRB: U10.K31 U16.H5 | length 777.4
  Top Layer w10: v2(1366,1476) U10.K31@1441.95,1476
  Routing 1 w12: v1(724.82,1470.82) 724.82,1478.97 737.85,1492 767,1492 830.18,1428.82 896.82,1428.82 921.82,1453.82 1242.82,1453.82 1265,1476 v2(1366,1476) v2@1367,1476
EMMC_RST: R111.1 SB28.2 U16.K5 | length 1908.2
  Top Layer w12: SB28.2@67.82,318.82 68.54,318.1 103.07,318.1 v3(103.78,317.39)
  Routing 1 w12: v3(103.78,317.39) v2(103.78,1051)
  Bottom Layer w12: R111.1@68.82,317.82 69.04,317.6 103.57,317.6 v3(103.78,317.39) ; v2(103.78,1051) 103.78,1400.78 280.82,1577.82 669.82,1577.82 686.03,1561.62 v1(686.03,1470.82)
EMMCCLK: P24.1 R57.2 SW5.1 U10.L28 | length 2433.7
  Top Layer w6: R57.2@1299.82,1434.82 1300,1435 v2(1332,1435) ; v1(1480,1463) v1(1480,1463) 1519.03,1501.96 U10.L28@1519.1,1501.96
  Top Layer w20: SW5.1@-4.65,514.25 SW5.1@-4.65,518.11 ; SW5.1@-4.65,665.82 v3(-4.65,590.04) SW5.1@-4.65,518.11 ; P24.1@77.82,525.82 3.07,525.82 SW5.1@-4.65,518.11
  Bottom Layer w5: v3(-4.65,590.04) -4.65,802.51 354.84,1162 1295,1162 1332,1199 v2(1332,1435) 1354,1435 1372,1453 1470,1453 v1(1480,1463)
EN_RT9193: R26.1 U7.3
EN_SPX3819: C12.1 R19.1 U6.3 | length 33.1
  Top Layer w22: v3(2773.82,1.82) 2806.04,1.82 U6.3@2806.64,2.42
EN_SY8088: C22.1 R1.1 U3.1
EN_SY8088#: C10.1 R16.1 U5.1 | length 24
  Bottom Layer w22: C10.1@2684.82,483.82 v3(2708.82,483.82)
EN_SYR837: C18.1 R9.1 U1.A2 | length 73.6
  Top Layer w8: R9.1@3300.82,232.82 3300.82,262.82 3305.33,267.33 U1.A2@3342.58,267.33
EN_SYR838: C15.1 R12.1 U2.A2 | length 75.5
  Top Layer w4: R12.1@2706.82,221.82 2706.82,245.49 2717.16,255.82 2734.07,255.82 U2.A2@2745.58,267.33
  Bottom Layer w10: v2(2708.82,209.01) 2709.32,209.51 C15.1@2709.32,212.82
EN_TPS563201: R13.1 U4.5 | length 56.2
  Top Layer w22: U4.5@3378,52.82 3378.5,52.32 3433.32,52.32 R13.1@3433.82,51.82
EXT_EN: R13.2 U9.55 | length 1783.8
  Top Layer w6: U9.55@1901.73,276.29 1941.29,276.29 1970,305 v2(1970,305.41) ; R13.2@3493.82,51.82 R13.2@3494,52
  Top Layer w8: R13.2@3494,52 v2(3531,52)
  Routing 1 w8: v2(1970,305.41) 2913.59,305.41 3167,52 v2(3531,52)
FAN_CTL: R117.2 U10.T31 | length 3181.3
  Top Layer w4: v2(1372,1606) 1418.41,1606 U10.T31@1442.33,1629.92
  Routing 1 w4: v2(1372,1606) 1414,1564 1414,1327 1471,1270 1843.35,1270 1921.35,1348 2162,1348 2550,960 v2(2550,905.82)
  Bottom Layer w12: v2(2550,905.82) R117.2@3947.82,905.82
FB_SY8088: C1.2 R3.1 R4.1 R5.1 U3.5
  other v3: 2414.82,90.82
FB_SY8088#: C9.2 R17.1 R18.1 U5.5 | length 65.2
  Top Layer w22: 2550.82,453.32 2583.82,420.32 v3(2583.82,401.82)